# Altium PCB ANT.PcbDoc
Units mil, origin at the board's own origin, x right, y up, seen from the top; angles counter-clockwise.
Board outline 2390 x 665 mil, 2 copper layers (Top Layer, Bottom Layer); 3 components, 0 nets, 5 pads, 0 vias.
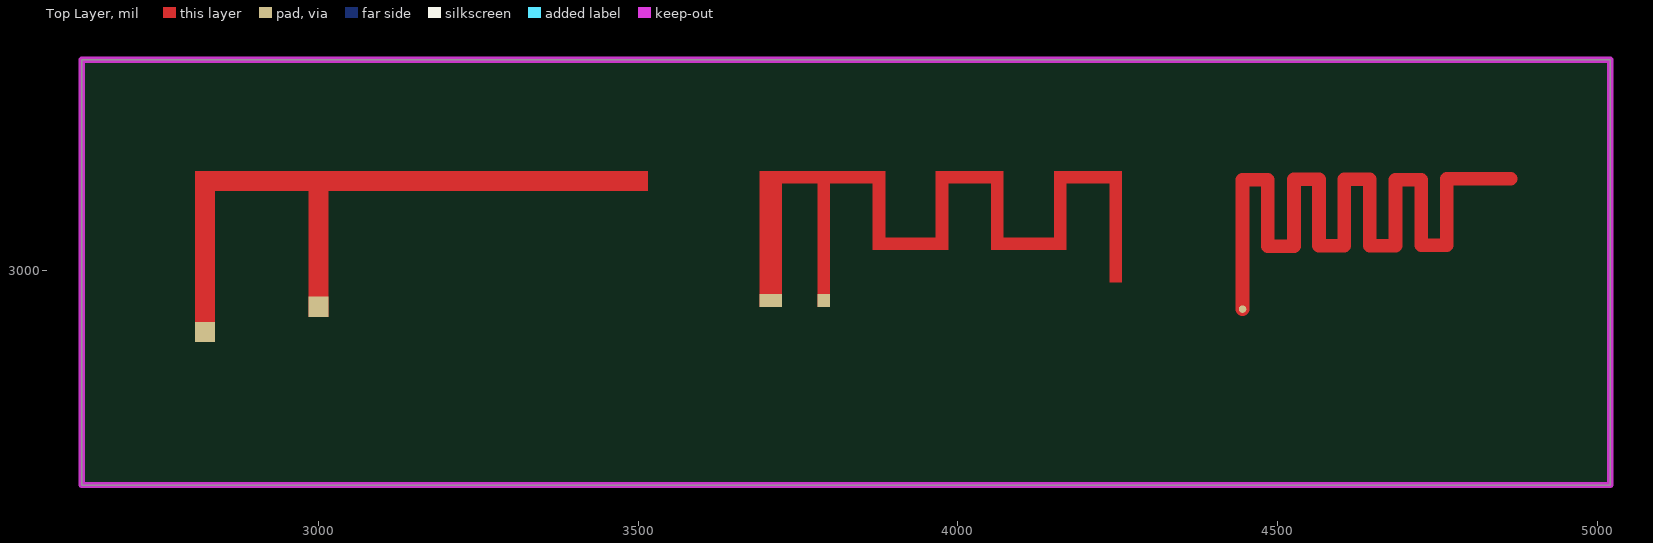
[diagram p0: Top Layer view]
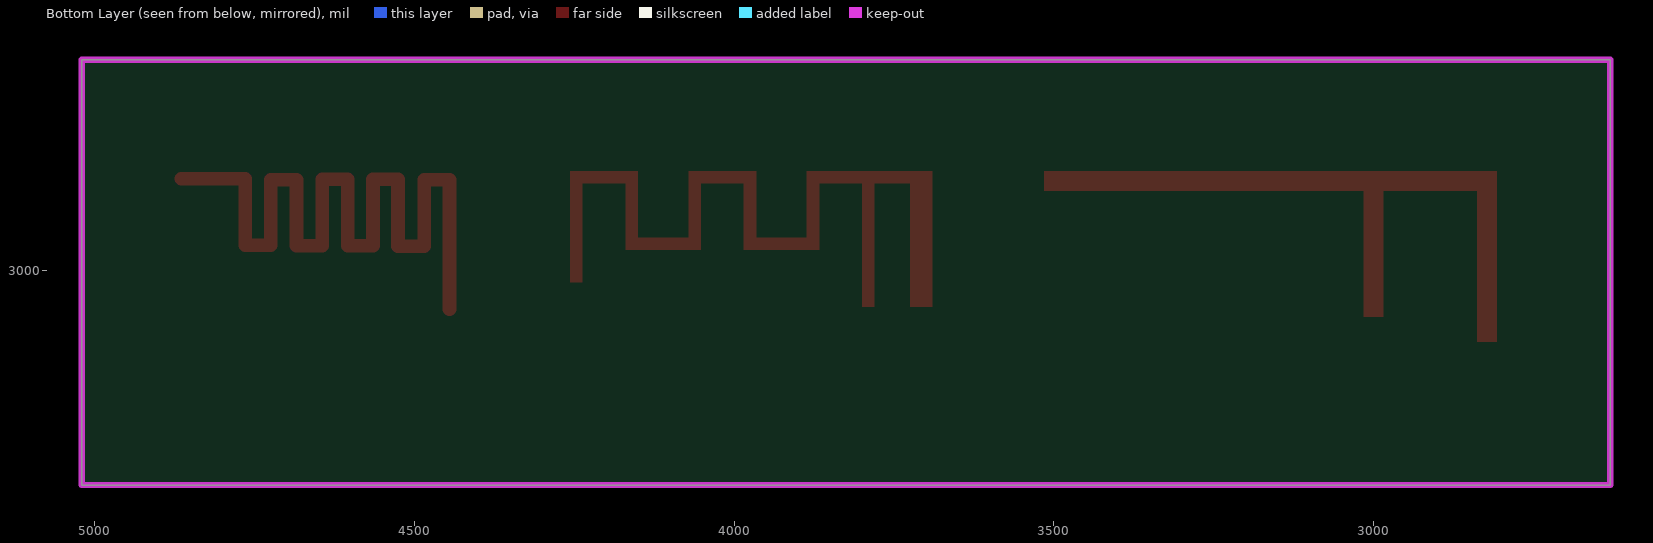
[diagram p1: Bottom Layer view, seen from below]

## Layer stack, top to bottom
Top Solder: solder mask 0.4, Solder Resist, Dk 3.5
Top Layer: signal copper 1.4
Dielectric 1: dielectric 12.6, FR-4, Dk 4.8
Bottom Layer: signal copper 1.4
Bottom Solder: solder mask 0.4, Solder Resist, Dk 3.5

## Board outline
2630,2665 2630,3330 5020,3330 5020,2665

## Design rules (kind name [scope] priority, off if disabled: settings)
Clearance [All] p1: gap=10
PolygonConnect [All] p1: connectstyle=Relief reliefconductorwidth=10 reliefentries=4 polygonreliefangle="90 Angle" airgapwidth=10
RoutingVias [All] p1: holewidth=28 width=50 viastyle="Through Hole" minholewidth=28 minwidth=50 maxholewidth=28 maxwidth=50
SolderMaskExpansion [All] p1: expansion=4
Width [All] p1: maxlimit=10 minlimit=10 preferedwidth=10
30 further rules are at their usual default settings.

## Components (designator, comment, footprint, x,y, rotation, side; value= is the part's Value field where it differs from the comment)
? "" ANT-BTM 4784.07,3163.5 r180 top
? "" ANT-TI 3748.66,2957.43 r0 top
? "" ANT-F 3000,2943.65 r0 top

## Footprints (in the part's own frame and the unit in brackets; to place one, negate y for a bottom-side part, rotate by r counter-clockwise, add the part's x,y. Pads: shape width x height; smd on the part's side, far side on the other; paste and mask are expansions set on the pad)
ANT-BTM [mm]
  round 0.3 smd: 1(8.612,5.677)
  Top Layer lines w0.54: 8.612,5.677 8.612,0.544 7.607,0.544 7.607,3.179 6.57,3.179 6.57,0.523 5.575,0.523 5.575,3.158 4.57,3.158 4.57,0.512 3.554,0.512 3.554,3.158 2.538,3.158 2.538,0.544 1.521,0.544 1.521,3.137 0.495,3.137 0.495,0.502 -2.045,0.502
ANT-F [mm]
  rect 0.8x0.8 smd: 0(-4.5,-1) 1(0,0)
  Top Layer region: -4.9,-1.4 -4.1,-1.4 -4.1,5.4 -4.9,5.4
  Top Layer region: -0.4,-0.4 0.4,-0.4 0.4,5.4 -0.4,5.4
  Top Layer region: -4.9,4.6 13.1,4.6 13.1,5.4 -4.9,5.4
ANT-TI [mm]
  rect 0.9x0.5 smd: 0(-1.05,-0.1)
  rect 0.5x0.5 smd: 1(1.05,-0.1)
  Top Layer region: 7.7,1.91 10.7,1.91 10.7,2.41 7.7,2.41
  Top Layer region: 7.7,1.91 8.2,1.91 8.2,5.05 7.7,5.05
  Top Layer region: 5.5,4.55 8.2,4.55 8.2,5.05 5.5,5.05
  Top Layer region: 5.5,1.91 6,1.91 6,5.05 5.5,5.05
  Top Layer region: 3,1.91 6,1.91 6,2.41 3,2.41
  Top Layer region: 0.8,-0.35 1.3,-0.35 1.3,5.05 0.8,5.05
  Top Layer region: -1.5,4.55 3.5,4.55 3.5,5.05 -1.5,5.05
  Top Layer region: -1.5,-0.35 -0.6,-0.35 -0.6,5.05 -1.5,5.05
  Top Layer region: 3,1.91 3.5,1.91 3.5,5.05 3,5.05
  Top Layer region: 10.2,1.91 10.7,1.91 10.7,5.05 10.2,5.05
  Top Layer region: 10.2,4.55 12.9,4.55 12.9,5.05 10.2,5.05
  Top Layer region: 12.4,0.61 12.9,0.61 12.9,5.05 12.4,5.05

## Nets (pads, with @x,y where several pads share a name; then routed paths per layer and width w, separated by ;. In a path a pad name is that pad's centre, name@x,y a point inside that pad or via, vN(x,y) a via of type N, cw(c..) or ccw(c..) an arc to the next point about the centre after c; other vN are vias at no path point)
pads on no net: ?.0 ?.1

## Keep-outs
Keep-Out Layer:
  the board outline again, w10